# Altium PCB TZ-SB-0001-PCB-[A] (HydroScope Mainboard).PcbDoc (part 2 of 4)
Units mil, origin at the board's own origin, x right, y up, seen from the top; angles counter-clockwise.
Board outline 4500 x 970 mil, 4 copper layers (Top Layer, GND-PWR, GND, Bottom Layer), stack 64.112 mil thick; 165 components, 114 nets, 573 pads, 320 vias.
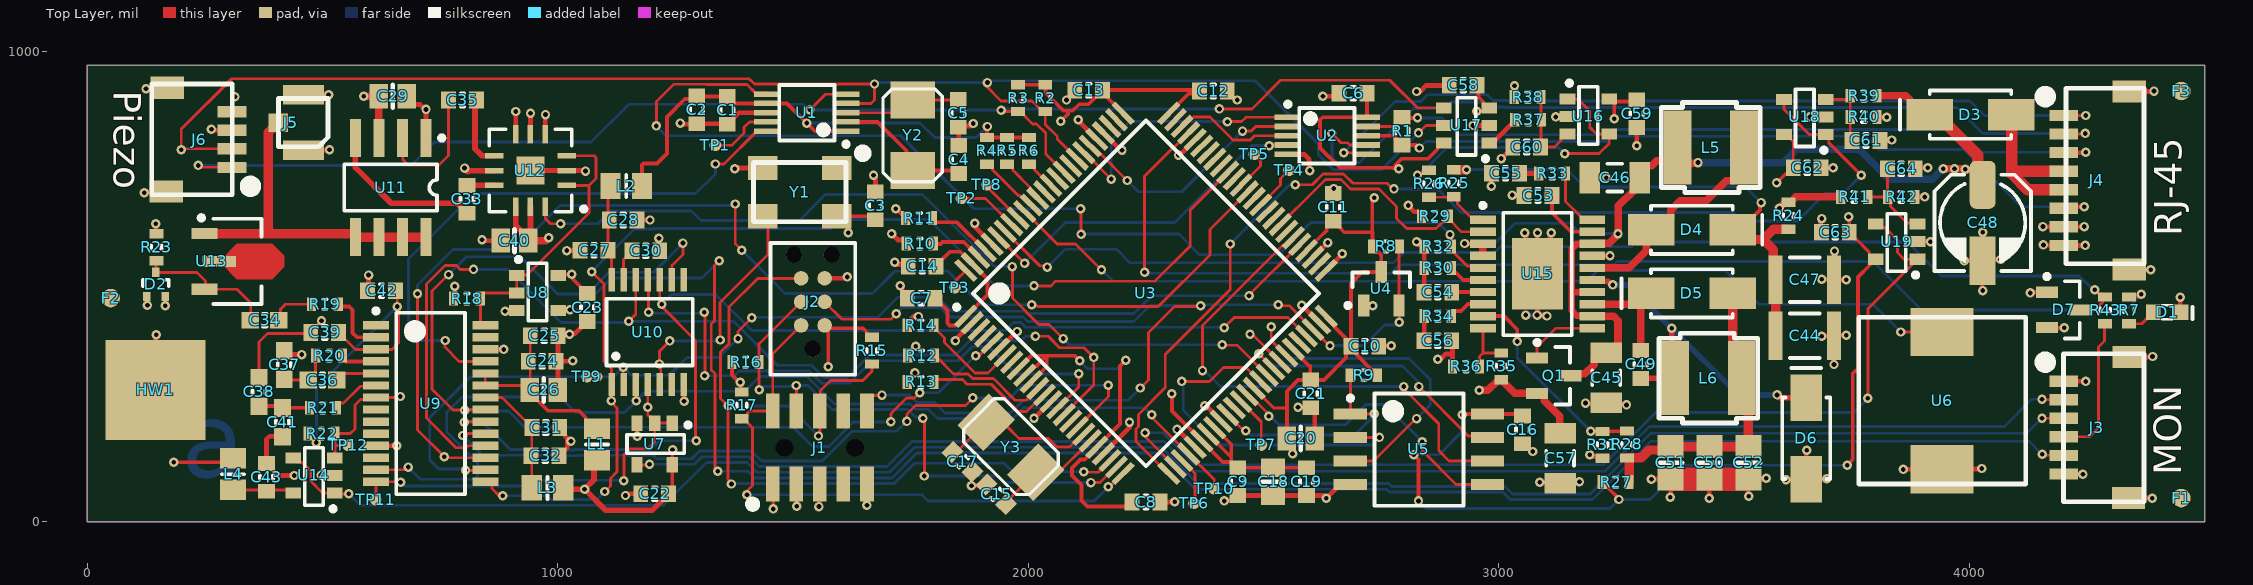
[diagram p0: Top Layer view]

## Part data (continued)
Q1: "TRANS NPN 60V 1A SOT23-3", Case/Package=SOT-23, Collector Base Voltage (VCBO)=80V, Collector Emitter Breakdown Voltage=60V, Collector Emitter Saturation Voltage=160mV, Continuous Collector Current=1A, Emitter Base Voltage (VEBO)=5V, Frequency=150MHz, Manufacturer="Diodes Zetex", Max Operating Temperature=150°C, Max Power Dissipation=500mW, Min Operating Temperature=-55°C, Package Quantity=3000, Supplier Part Number 1=FMMT491CT-ND, Collector Emitter Voltage (VCEO)=60V, ComponentLink1Description=https://datasheet.ciiva.com/974/fmmt491-974176.pdf, ComponentLink1URL=https://datasheet.ciiva.com/974/fmmt491-974176.pdf, ComponentLink2Description=https://datasheet.ciiva.com/5782/313018-5782560.pdf, ComponentLink2URL=https://datasheet.ciiva.com/5782/313018-5782560.pdf, ComponentLink3Description=https://datasheet.ciiva.com/974/fmmt491-974177.pdf, ComponentLink3URL=https://datasheet.ciiva.com/974/fmmt491-974177.pdf, ComponentLink4Description=https://datasheet.ciiva.com/974/fmmt491-974178.pdf, ComponentLink4URL=https://datasheet.ciiva.com/974/fmmt491-974178.pdf, ComponentLink5Description=https://datasheet.ciiva.com/11198/fmmt491-11198278.pdf, ComponentLink5URL=https://datasheet.ciiva.com/11198/fmmt491-11198278.pdf, ComponentLink6Description=https://datasheet.ciiva.com/16211/fmmt491-16211079.pdf, ComponentLink6URL=https://datasheet.ciiva.com/16211/fmmt491-16211079.pdf, ComponentLink7Description=https://datasheet.ciiva.com/15139/getdatasheetpartid-76595-15139033.pdf, ComponentLink7URL=https://datasheet.ciiva.com/15139/getdatasheetpartid-76595-15139033.pdf, ComponentLink8Description=https://datasheet.ciiva.com/4723/fmmt491-4723531.pdf, ComponentLink8URL=https://datasheet.ciiva.com/4723/fmmt491-4723531.pdf, ComponentLink9Description=https://datasheet.ciiva.com/8029/313018-8029549.pdf, ComponentLink9URL=https://datasheet.ciiva.com/8029/313018-8029549.pdf, ComponentLink10Description=https://datasheet.ciiva.com/16614/fmmt491-16614670.pdf, ComponentLink10URL=https://datasheet.ciiva.com/16614/fmmt491-16614670.pdf, ComponentLink11Description=https://datasheet.ciiva.com/5782/313018-5782559.pdf, ComponentLink11URL=https://datasheet.ciiva.com/5782/313018-5782559.pdf, Current Rating=1A, Element Configuration=Single, Gain Bandwidth Product=150MHz, Height=1.02mm, hFE Min=100, Lead Free="Lead Free", Length=3.04mm, Manufacturer Part Number=FMMT491TA, Max Breakdown Voltage=60V, Max Collector Current=1A, Max Frequency=150MHz, Mount="Surface Mount", Number of Elements=1, Number of Pins=3, Packaging="Tape and Reel", Polarity=NPN, Power Dissipation=500mW, Pricing 1="1=0.49, 10=0.399, 100=0.2719, 500=0.20394, 1000=0.15296 (USD)", Radiation Hardening=No, REACH SVHC="No SVHC", Stock 1=30887, Supplier 1=Digi-Key, Termination=SMD/SMT, Transition Frequency=150MHz, Voltage Rating (DC)=60V, Weight=0.000282oz, Width=1.4mm
R1 R20 R21: library part ERJ-3EKF1000V, "RES 100 OHM 1/10W 1% 0603 SMD", Limiting Element Voltage=75, Manufacturer="Panasonic Electronic Components", Maximum Overload Voltage=150, Maximum Working Voltage=3.2V, Package="0603 (1608 Metric)", Package Power="0603  (0.1W)", Power (Watts)="0.1W- 1/10W", Ratings=AEC-Q200, Sort Value Package=603_100, Supplier Package=0603, Supplier Part Number 1=P100HCT-ND, Temperature Coefficient=±100ppm/°C, Tolerance=±1%, Category=Resistors, ComponentLink1Description="Internal Datasheet", ComponentLink1URL="datasheets\Panasonic Electronic Components\AOA0000CE2.pdf", ComponentLink2Description="External Datasheet", ComponentLink2URL=http://industrial.panasonic.com/www-data/pdf/AOA0000/AOA0000CE2.pdf, Composition="Thick Film", Features=-, Height=0.55MM, Manufacturer Part Number=ERJ-3EKF1000V, Number of Terminations=2, Packaging="Cut Tape (CT)", Resistance (Ohms)=100, Size / Dimension="0.063\" L x 0.031\" W (1.60mm x 0.80mm)", Sort Value=100, Substitution Notes="100 , ±1% , 0603 , AEC-Q200", Supplier 1=Digi-Key
  R1: Stocked=0
R2 R3 R7 R23 R43: library part ERJ-3EKF1001V, "RES 1K OHM 1/10W 1% 0603 SMD", Limiting Element Voltage=75, Manufacturer="Panasonic Electronic Components", Maximum Overload Voltage=150, Maximum Working Voltage=10.0V, Package="0603 (1608 Metric)", Package Power="0603  (0.1W)", Power (Watts)="0.1W- 1/10W", Ratings=AEC-Q200, Sort Value=1000, Sort Value Package=603_1000, Supplier Package=0603, Supplier Part Number 1=P1.00KHCT-ND, Temperature Coefficient=±100ppm/°C, Tolerance=±1%, Category=Resistors, ComponentLink1Description="Internal Datasheet", ComponentLink1URL="datasheets\Panasonic Electronic Components\AOA0000CE2.pdf", ComponentLink2Description="External Datasheet", ComponentLink2URL=http://industrial.panasonic.com/www-data/pdf/AOA0000/AOA0000CE2.pdf, Composition="Thick Film", Features=-, Height=0.55MM, Manufacturer Part Number=ERJ-3EKF1001V, Number of Terminations=2, Packaging="Cut Tape (CT)", Resistance (Ohms)=1k, Size / Dimension="0.063\" L x 0.031\" W (1.60mm x 0.80mm)", Substitution Notes="1k , ±1% , 0603 , AEC-Q200", Supplier 1=Digi-Key
R4 R5 R6 R8 R9 R10 R11 R12 R13 R15 R16 R17 R18 R26 R29 R31 R32 R36 R38 R40 R42: library part ERJ-3EKF1002V, "RES 10K OHM 1/10W 1% 0603 SMD", Limiting Element Voltage=75, Manufacturer="Panasonic Electronic Components", Maximum Overload Voltage=150, Maximum Working Voltage=31.6V, Package="0603 (1608 Metric)", Package Power="0603  (0.1W)", Power (Watts)="0.1W- 1/10W", Ratings=AEC-Q200, Sort Value=10000, Sort Value Package=603_10000, Supplier Package=0603, Supplier Part Number 1=P10.0KHCT-ND, Temperature Coefficient=±100ppm/°C, Tolerance=±1%, Category=Resistors, ComponentLink1Description="Internal Datasheet", ComponentLink1URL="datasheets\Panasonic Electronic Components\AOA0000CE2.pdf", ComponentLink2Description="External Datasheet", ComponentLink2URL=http://industrial.panasonic.com/www-data/pdf/AOA0000/AOA0000CE2.pdf, Composition="Thick Film", Features=-, Height=0.55MM, Manufacturer Part Number=ERJ-3EKF1002V, Number of Terminations=2, Packaging="Cut Tape (CT)", Resistance (Ohms)=10k, Size / Dimension="0.063\" L x 0.031\" W (1.60mm x 0.80mm)", Substitution Notes="10k , ±1% , 0603 , AEC-Q200", Supplier 1=Digi-Key
R14: library part ERJ-3EKF1242V, "RES 12.4K OHM 1/10W 1% 0603 SMD", Limiting Element Voltage=75, Manufacturer="Panasonic Electronic Components", Maximum Overload Voltage=150, Maximum Working Voltage=35.2V, Package="0603 (1608 Metric)", Package Power="0603  (0.1W)", Power (Watts)="0.1W- 1/10W", Ratings=AEC-Q200, Sort Value=12400, Sort Value Package=603_12400, Supplier Package=0603, Supplier Part Number 1=P12.4KHCT-ND, Temperature Coefficient=±100ppm/°C, Tolerance=±1%, Category=Resistors, ComponentLink1Description="Internal Datasheet", ComponentLink1URL="datasheets\Panasonic Electronic Components\AOA0000CE2.pdf", ComponentLink2Description="External Datasheet", ComponentLink2URL=http://industrial.panasonic.com/www-data/pdf/AOA0000/AOA0000CE2.pdf, Composition="Thick Film", Features=-, Height=0.55MM, Manufacturer Part Number=ERJ-3EKF1242V, Number of Terminations=2, Packaging="Cut Tape (CT)", Resistance (Ohms)=12.4k, Size / Dimension="0.063\" L x 0.031\" W (1.60mm x 0.80mm)", Substitution Notes="12.4k , ±1% , 0603 , AEC-Q200", Supplier 1=Digi-Key
R19 R24 R27: library part ERJ-3GEY0R00V, "RES 0.0 OHM 1/10W JUMP 0603 SMD", Limiting Element Voltage=75, Manufacturer="Panasonic Electronic Components", Maximum Overload Voltage=150, Maximum Working Voltage=0.0V, Package="0603 (1608 Metric)", Package Power="0603  (0.1W)", Power (Watts)="0.1W- 1/10W", Ratings=AEC-Q200, Sort Value Package=603_0, Supplier Package=0603, Supplier Part Number 1=P0.0GCT-ND, Temperature Coefficient=-, Tolerance=Jumper, Category=Resistors, ComponentLink1Description="Internal Datasheet", ComponentLink1URL="datasheets\Panasonic Electronic Components\AOA0000CE1.pdf", ComponentLink2Description="External Datasheet", ComponentLink2URL=http://industrial.panasonic.com/www-data/pdf/AOA0000/AOA0000CE1.pdf, Composition="Thick Film", Features=-, Height=0.55MM, Manufacturer Part Number=ERJ-3GEY0R00V, Number of Terminations=2, Resistance (Ohms)=0, Size / Dimension="0.063\" L x 0.031\" W (1.60mm x 0.80mm)", Sort Value=0, Substitution Notes="0 , Jumper , 0603 , AEC-Q200", Supplier 1=Digi-Key
R22: library part ERJ-3EKF5101V, "RES 5.1K OHM 1/10W 1% 0603 SMD", Limiting Element Voltage=75, Manufacturer="Panasonic Electronic Components", Maximum Overload Voltage=150, Maximum Working Voltage=22.6V, Package="0603 (1608 Metric)", Package Power="0603  (0.1W)", Power (Watts)="0.1W- 1/10W", Ratings=AEC-Q200, Sort Value=5100, Sort Value Package=603_5100, Supplier Package=0603, Supplier Part Number 1=P5.10KHCT-ND, Temperature Coefficient=±100ppm/°C, Tolerance=±1%, Category=Resistors, ComponentLink1Description="Internal Datasheet", ComponentLink1URL="datasheets\Panasonic Electronic Components\AOA0000CE2.pdf", ComponentLink2Description="External Datasheet", ComponentLink2URL=http://industrial.panasonic.com/www-data/pdf/AOA0000/AOA0000CE2.pdf, Composition="Thick Film", Features=-, Height=0.55MM, Manufacturer Part Number=ERJ-3EKF5101V, Number of Terminations=2, Packaging="Cut Tape (CT)", Resistance (Ohms)=5.1k, Size / Dimension="0.063\" L x 0.031\" W (1.60mm x 0.80mm)", Substitution Notes="5.1k , ±1% , 0603 , AEC-Q200", Supplier 1=Digi-Key
R25: library part ERJ-3EKF5603V, "RES 560K OHM 1/10W 1% 0603 SMD", Limiting Element Voltage=75, Manufacturer="Panasonic Electronic Components", Maximum Overload Voltage=150, Maximum Working Voltage=75.0V, Package="0603 (1608 Metric)", Package Power="0603  (0.1W)", Power (Watts)="0.1W- 1/10W", Ratings=AEC-Q200, Sort Value=560000, Sort Value Package=603_560000, Supplier Package=0603, Supplier Part Number 1=P560KHCT-ND, Temperature Coefficient=±100ppm/°C, Tolerance=±1%, Category=Resistors, ComponentLink1Description="Internal Datasheet", ComponentLink1URL="datasheets\Panasonic Electronic Components\AOA0000CE2.pdf", ComponentLink2Description="External Datasheet", ComponentLink2URL=http://industrial.panasonic.com/www-data/pdf/AOA0000/AOA0000CE2.pdf, Composition="Thick Film", Features=-, Height=0.55MM, Manufacturer Part Number=ERJ-3EKF5603V, Number of Terminations=2, Packaging="Cut Tape (CT)", Resistance (Ohms)=560k, Size / Dimension="0.063\" L x 0.031\" W (1.60mm x 0.80mm)", Substitution Notes="560k , ±1% , 0603 , AEC-Q200", Supplier 1=Digi-Key
R28 R37: library part ERJ-3EKF3162V, "RES 31.6K OHM 1/10W 1% 0603 SMD", Limiting Element Voltage=75, Manufacturer="Panasonic Electronic Components", Maximum Overload Voltage=150, Maximum Working Voltage=56.2V, Package="0603 (1608 Metric)", Package Power="0603  (0.1W)", Power (Watts)="0.1W- 1/10W", Ratings=AEC-Q200, Sort Value=31600, Sort Value Package=603_31600, Supplier Package=0603, Supplier Part Number 1=P31.6KHCT-ND, Temperature Coefficient=±100ppm/°C, Tolerance=±1%, Category=Resistors, ComponentLink1Description="Internal Datasheet", ComponentLink1URL="datasheets\Panasonic Electronic Components\AOA0000CE2.pdf", ComponentLink2Description="External Datasheet", ComponentLink2URL=http://industrial.panasonic.com/www-data/pdf/AOA0000/AOA0000CE2.pdf, Composition="Thick Film", Features=-, Height=0.55MM, Manufacturer Part Number=ERJ-3EKF3162V, Number of Terminations=2, Packaging="Cut Tape (CT)", Resistance (Ohms)=31.6k, Size / Dimension="0.063\" L x 0.031\" W (1.60mm x 0.80mm)", Substitution Notes="31.6k , ±1% , 0603 , AEC-Q200", Supplier 1=Digi-Key
R30 R33 R34: library part ERJ-3EKF4302V, "RES 43K OHM 1/10W 1% 0603 SMD", Limiting Element Voltage=75, Manufacturer="Panasonic Electronic Components", Maximum Overload Voltage=150, Maximum Working Voltage=65.6V, Package="0603 (1608 Metric)", Package Power="0603  (0.1W)", Power (Watts)="0.1W- 1/10W", Ratings=AEC-Q200, Sort Value=43000, Sort Value Package=603_43000, Supplier Package=0603, Supplier Part Number 1=P43.0KHCT-ND, Temperature Coefficient=±100ppm/°C, Tolerance=±1%, Category=Resistors, ComponentLink1Description="Internal Datasheet", ComponentLink1URL="datasheets\Panasonic Electronic Components\AOA0000CE2.pdf", ComponentLink2Description="External Datasheet", ComponentLink2URL=http://industrial.panasonic.com/www-data/pdf/AOA0000/AOA0000CE2.pdf, Composition="Thick Film", Features=-, Height=0.55MM, Manufacturer Part Number=ERJ-3EKF4302V, Number of Terminations=2, Packaging="Cut Tape (CT)", Resistance (Ohms)=43k, Size / Dimension="0.063\" L x 0.031\" W (1.60mm x 0.80mm)", Substitution Notes="43k , ±1% , 0603 , AEC-Q200", Supplier 1=Digi-Key
R35: library part ERJ-3EKF1003V, "RES 100K OHM 1/10W 1% 0603 SMD", Limiting Element Voltage=75, Manufacturer="Panasonic Electronic Components", Maximum Overload Voltage=150, Maximum Working Voltage=75.0V, Package="0603 (1608 Metric)", Package Power="0603  (0.1W)", Power (Watts)="0.1W- 1/10W", Ratings=AEC-Q200, Sort Value=100000, Sort Value Package=603_100000, Supplier Package=0603, Supplier Part Number 1=P100KHCT-ND, Temperature Coefficient=±100ppm/°C, Tolerance=±1%, Category=Resistors, ComponentLink1Description="Internal Datasheet", ComponentLink1URL="datasheets\Panasonic Electronic Components\AOA0000CE2.pdf", ComponentLink2Description="External Datasheet", ComponentLink2URL=http://industrial.panasonic.com/www-data/pdf/AOA0000/AOA0000CE2.pdf, Composition="Thick Film", Features=-, Height=0.55MM, Manufacturer Part Number=ERJ-3EKF1003V, Number of Terminations=2, Packaging="Cut Tape (CT)", Resistance (Ohms)=100k, Size / Dimension="0.063\" L x 0.031\" W (1.60mm x 0.80mm)", Substitution Notes="100k , ±1% , 0603 , AEC-Q200", Supplier 1=Digi-Key
R39 R41: library part ERJ-3EKF3743V, "RES 374K OHM 1/10W 1% 0603 SMD", Limiting Element Voltage=75, Manufacturer="Panasonic Electronic Components", Maximum Overload Voltage=150, Maximum Working Voltage=75.0V, Package="0603 (1608 Metric)", Package Power="0603  (0.1W)", Power (Watts)="0.1W- 1/10W", Ratings=AEC-Q200, Sort Value=374000, Sort Value Package=603_374000, Supplier Package=0603, Supplier Part Number 1=P374KHCT-ND, Temperature Coefficient=±100ppm/°C, Tolerance=±1%, Category=Resistors, ComponentLink1Description="Internal Datasheet", ComponentLink1URL="datasheets\Panasonic Electronic Components\AOA0000CE2.pdf", ComponentLink2Description="External Datasheet", ComponentLink2URL=http://industrial.panasonic.com/www-data/pdf/AOA0000/AOA0000CE2.pdf, Composition="Thick Film", Features=-, Height=0.55MM, Manufacturer Part Number=ERJ-3EKF3743V, Number of Terminations=2, Packaging="Cut Tape (CT)", Resistance (Ohms)=374k, Size / Dimension="0.063\" L x 0.031\" W (1.60mm x 0.80mm)", Substitution Notes="374k , ±1% , 0603 , AEC-Q200", Supplier 1=Digi-Key
U1: "Clock Generators & Support Products Any-Rate, Dual PLL 1 60MHz Clock 8outputs", Case/Package=MSOP, Manufacturer="Silicon Labs", Max Frequency=160MHz, Max Operating Temperature=85°C, Min Operating Temperature=-40°C, Operating Supply Current=22mA, Operating Supply Voltage=3.3V, Package Quantity=2500, Supplier Part Number 1=336-3908-1-ND, ComponentLink1Description=http://www.mouser.com/ds/2/368/Si5351-B-346869.pdf, ComponentLink1URL=http://www.mouser.com/ds/2/368/Si5351-B-346869.pdf, ComponentLink2Description=https://www.silabs.com/Support%20Documents/TechnicalDocs/Si5350-51-short.pdf, ComponentLink2URL=https://www.silabs.com/Support%20Documents/TechnicalDocs/Si5350-51-short.pdf, ComponentLink3Description=https://www.silabs.com/Support%20Documents/TechnicalDocs/Si5351-B.pdf, ComponentLink3URL=https://www.silabs.com/Support%20Documents/TechnicalDocs/Si5351-B.pdf, Input=Crystal, Manufacturer Part Number=SI5351A-B-GTR, Max Duty Cycle=55%, Mount="Surface Mount", Number of Circuits=1, Number of Outputs=3, Number of Pins=10, Packaging="Tape and Reel", PLL=Yes, Pricing 1="1=0.92, 25=0.8816, 100=0.8475 (USD)", Stock 1=11416, Supplier 1=Digi-Key
U2: "IC TXRX RS422/485 20MBPS 10MSOP", Manufacturer=Intersil, Operating Temperature="-40°C ~ 85°C", Package / Case="10-TFSOP, 10-MSOP (0.118\", 3.00mm Width)", Supplier Device Package=10-MSOP, Supplier Part Number 1=ISL3176EIUZ-TCT-ND, Voltage - Supply="3 V ~ 3.6 V", Category="Integrated Circuits (ICs)", ComponentLink1Description=http://www.intersil.com/content/dam/intersil/documents/isl3/isl3170e-71e-72e-73e-74e-75e-76e-77e-78e.pdf, ComponentLink1URL=http://www.intersil.com/content/dam/intersil/documents/isl3/isl3170e-71e-72e-73e-74e-75e-76e-77e-78e.pdf, Data Rate=20Mbps, Duplex=Full, Manufacturer Part Number=ISL3176EIUZ-T, Mounting Type="Surface Mount", Number of Drivers/Receivers=1/1, Packaging="Cut Tape (CT)", Part Status=Active, Pricing 1="1=1.79, 10=1.61, 100=1.2944, 500=1.06348, 1000=0.88117 (USD)", Protocol="RS422, RS485", RoHS="RoHS Compliant", Stock 1=9164, Supplier 1=Digi-Key, Type=Transceiver
U3: "32-BIT ARM CORTEX-M4", Manufacturer="NXP USA Inc.", Operating Temperature="-40°C ~ 105°C (TA)", Package / Case=100-LQFP, Supplier Device Package="100-LQFP (14x14)", Supplier Part Number 1=568-13456-ND, Voltage - Supply (Vcc/Vdd)="1.71 V ~ 3.6 V", Category="Integrated Circuits (ICs)", ComponentLink1Description=http://www.nxp.com/docs/en/data-sheet/LPC546XX.pdf, ComponentLink1URL=http://www.nxp.com/docs/en/data-sheet/LPC546XX.pdf, Connectivity="CAN, Ethernet, I²C, SPI, UART/USART, USB", Core Processor="ARM® Cortex®-M4", Core Size=32-Bit, Data Converters="A/D 12x12b", EEPROM Size="16K x 8", Manufacturer Part Number=LPC54606J512BD100E, Oscillator Type=Internal, Packaging=Tray, Part Status=Active, Peripherals="Brown-out Detect/Reset, DMA, I²S, POR, PWM, WDT", Program Memory Size="512KB (512K x 8)", Program Memory Type=FLASH, RAM Size="200K x 8", RoHS="Request Inventory Verification", Speed=180MHz, Stock 1=0, Supplier 1=Digi-Key
U4: "3-Pin Microprocessor Supervisor Circuit w/ Open-Drain Reset Output, 3 SOT-23 - T/R", Case/Package=TO-236-3, Manufacturer=Microchip, Max Operating Temperature=125°C, Min Operating Temperature=-40°C, Number of Voltages Monitored=1, Supplier Part Number 1=576-3808-1-ND, Threshold Voltage=3V, Lead Free="Lead Free", Manufacturer Part Number=MIC803-30D2VM3-TR, Mount="Surface Mount", Packaging="Cit Tape (CT)", Pricing 1="1=0.3, 25=0.252, 100=0.231 (USD)", Reset="Active Low", Reset Timeout=20ms, Stock 1=3642, Supplier 1=Digi-Key, Type="Simple Reset/Power-On Reset"
U5: "NOR Flash Serial-SPI 3V 64MBit 64M x 1bit 6ns 8-Pin SOIC", Case/Package=SOIC, Frequency=104MHz, Manufacturer=Winbond, Max Operating Temperature=85°C, Max Supply Voltage=3.6V, Min Operating Temperature=-40°C, Min Supply Voltage=2.7V, Operating Supply Voltage=3V, Supplier Part Number 1=W25Q64JVSSIQ-ND, Access Time=6ns, Address Bus Width=24b, ComponentLink1Description=http://www.winbond.com/resource-files/w25q64jv%20spi%20revg%2012142016.pdf, ComponentLink1URL=http://www.winbond.com/resource-files/w25q64jv%20spi%20revg%2012142016.pdf, ComponentLink2Description=https://www.winbond.com/resource-files/w25q64jv%20spi%20%20%20revc%2006032016%20kms.pdf, ComponentLink2URL=https://www.winbond.com/resource-files/w25q64jv%20spi%20%20%20revc%2006032016%20kms.pdf, Density=64MB, Interface=SPI,Serial, Manufacturer Part Number=W25Q64JVSSIQ, Memory Type=NOR,FLASH, Mount="Surface Mount", Packaging=Tray, Page Size=256B, Pricing 1="1=1.36 (USD)", Stock 1=41923, Supplier 1=Digi-Key
U6: "Audio Indicators & Alerts Piezo Buzzer 9x9mm 4KHz 1.9mm Thickness", Frequency=4kHz, Manufacturer=Murata, Max Operating Temperature=85°C, Max Supply Voltage (DC)=12.5V, Min Operating Temperature=-40°C, Min Supply Voltage (DC)=-12.5V, Package Quantity=2000, Supplier Part Number 1=490-9647-1-ND, Voltage Rating=1.5V, ComponentLink1Description=https://datasheet.ciiva.com/24244/pkmcs0909e4000-r1-304946-24244386.pdf, ComponentLink1URL=https://datasheet.ciiva.com/24244/pkmcs0909e4000-r1-304946-24244386.pdf, Depth=9mm, Height=1.9mm, Lead Free="Lead Free", Length=9mm, Manufacturer Part Number=PKMCS0909E4000-R1, Mount="Surface Mount", Packaging="Tape and Reel", Pricing 1="1=1.96, 10=1.708, 25=1.3284, 50=1.2018, 100=1.0753, 250=1.04364, 500=1.012, 1000=0.91713 (USD)", Radiation Hardening=No, REACH SVHC="No SVHC", Self Resonant Frequency=4kHz, Stock 1=28739, Supplier 1=Digi-Key, Termination=Solder, Voltage Rating (DC)=12.5V, Width=9mm
U7 U8: "IC SGL 2IN POS-AND GATE SOT23-5", Current - Output High, Low="8mA, 8mA", Manufacturer="Texas Instruments", Operating Temperature="-40°C ~ 85°C", Package / Case="SOT-23-5, SC-74A, SOT-25", Supplier Part Number 1=296-1091-1-ND, Voltage - Supply="2 V ~ 5.5 V", Category="Integrated Circuits (ICs)", ComponentLink1Description=http://focus.ti.com/lit/ds/symlink/sn74ahc1g08.pdf, ComponentLink1URL=http://focus.ti.com/lit/ds/symlink/sn74ahc1g08.pdf, Logic Type="AND Gate", Manufacturer Part Number=SN74AHC1G08DBVR, Mounting Type="Surface Mount", Number of Circuits=1, Number of Inputs=2, Packaging="Cut Tape (CT)", Pricing 1="1=0.53, 25=0.31, 100=0.25, 250=0.18, 500=0.145, 1000=0.1125 (USD)", RoHS="RoHS Compliant", Stock 1=63967, Supplier 1=Digi-Key
U9: "IC AFE ULTRA SENSING 28TSSOP", Manufacturer="Texas Instruments", Operating Temperature="-40°C ~ 125°C", Package / Case="28-TSSOP (0.173\", 4.40mm Width)", Supplier Device Package=28-TSSOP, Supplier Part Number 1=296-39657-ND, Category="Integrated Circuits (ICs)", ComponentLink1Description=http://www.ti.com/lit/ds/symlink/tdc1000.pdf, ComponentLink1URL=http://www.ti.com/lit/ds/symlink/tdc1000.pdf, Input Type=Ultrasound, Interface=SPI, Manufacturer Part Number=TDC1000PW, Mounting Type="Surface Mount", Output Type=Digital, Packaging=Tray, Part Status=Active, Pricing 1="1=6.61, 10=5.152, 25=4.1796, 100=3.5964, 250=3.3048, 500=3.0132, 1000=2.8188 (USD)", RoHS="RoHS Compliant", Stock 1=125, Supplier 1=Digi-Key, Type="Front End"
U10: "IC DIG CONV 14TSSOP", Manufacturer="Texas Instruments", Operating Temperature="-40°C ~ 85°C", Package / Case="14-TSSOP (0.173\", 4.40mm Width)", Supplier Device Package=14-TSSOP, Supplier Part Number 1=296-44361-6-ND, Category="Integrated Circuits (ICs)", ComponentLink1Description=http://www.ti.com/lit/ds/symlink/tdc7200.pdf, ComponentLink1URL=http://www.ti.com/lit/ds/symlink/tdc7200.pdf, Input Type=Ultrasound, Interface=SPI, Manufacturer Part Number=TDC7200PWR, Mounting Type="Surface Mount", Output Type=Digital, Packaging=Digi-Reel®, Part Status=Active, Pricing 1="1=2.77, 10=2.138, 25=1.782, 100=1.5048, 250=1.4256, 500=1.2672, 1000=1.188 (USD)", RoHS="RoHS Compliant", Stock 1=2396, Supplier 1=Digi-Key, Type="Time to Flight to Digital Converter"
U11: "Trans MOSFET N/P-CH 200V 8-Pin SOIC N T/R", Case/Package=SOIC, Continuous Drain Current (ID)=-2A, Drain to Source Breakdown Voltage=200V, Drain to Source Resistance=8R, Manufacturer="Microchip Supertex", Max Operating Temperature=150°C, Min Operating Temperature=-55°C, On-State Resistance=15R, Package Quantity=2000, Supplier Part Number 1=TC6320TG-GCT-ND, ComponentLink1Description=https://datasheet.ciiva.com/30195/tc6320-30195222.pdf, ComponentLink1URL=https://datasheet.ciiva.com/30195/tc6320-30195222.pdf, ComponentLink2Description=https://datasheet.ciiva.com/15746/md0100-15746487.pdf, ComponentLink2URL=https://datasheet.ciiva.com/15746/md0100-15746487.pdf, ComponentLink3Description=https://datasheet.ciiva.com/30248/656md0100-30248377.pdf, ComponentLink3URL=https://datasheet.ciiva.com/30248/656md0100-30248377.pdf, Fall Time=15ns, Length=4.6mm, Manufacturer Part Number=TC6320TG-G, Mount="Surface Mount", Number of Elements=2, Number of Pins=8, Packaging="Tape and Reel", Pricing 1="1=1.42, 25=1.1768, 100=1.114 (USD)", Pricing 2="1=1.24, 25=1.0284, 100=0.9328 (USD)", Radiation Hardening=No, Rise Time=15ns, Stock 1=1592, Stock 2=609, Supplier 1=Digi-Key, Supplier 2=Digi-Key, Supplier Part Number 2=MD0100N8-GCT-ND, Turn-Off Delay Time=20ns, Turn-On Delay Time=10ns
U12: "Gate Drivers HI SPD DUAL MOSFET DRIVER", Case/Package=QFN, Frequency=100kHz, Manufacturer="Microchip Supertex", Max Operating Temperature=85°C, Max Output Current=2A, Max Supply Voltage=13V, Min Operating Temperature=-20°C, Min Supply Voltage=4.5V, Nominal Supply Current=550uA, Operating Supply Voltage=12V, Package Quantity=3000, Supplier Part Number 1=MD1213K6-GCT-ND, ComponentLink1Description=https://datasheet.ciiva.com/4898/md1213-30882-4898732.pdf, ComponentLink1URL=https://datasheet.ciiva.com/4898/md1213-30882-4898732.pdf, ComponentLink2Description=https://datasheet.ciiva.com/30175/md1213-30175933.pdf, ComponentLink2URL=https://datasheet.ciiva.com/30175/md1213-30175933.pdf, Fall Time=6ns, Manufacturer Part Number=MD1213K6-G, Mount="Surface Mount", Number of Drivers=2, Number of Outputs=2, Number of Pins=12, Output Current=2A, Packaging="Tape and Reel", Pricing 1="1=1.61, 25=1.3464, 100=1.219 (USD)", Propagation Delay=7ns, Rise Time=6ns, Stock 1=2628, Supplier 1=Digi-Key
U13: "High Voltage Protection T/R Switch 4-Pin(3+Tab) SOT-89", Case/Package=SOT-89, Manufacturer="Microchip Supertex", Max Operating Temperature=125°C, Min Operating Temperature=-40°C, On-State Resistance=15R, Package Quantity=2000, Supplier Part Number 1=MD0100N8-GCT-ND, ComponentLink1Description=https://datasheet.ciiva.com/15746/md0100-15746487.pdf, ComponentLink1URL=https://datasheet.ciiva.com/15746/md0100-15746487.pdf, ComponentLink2Description=https://datasheet.ciiva.com/30248/656md0100-30248377.pdf, ComponentLink2URL=https://datasheet.ciiva.com/30248/656md0100-30248377.pdf, Length=4.6mm, Manufacturer Part Number=MD0100N8-G, Mount="Surface Mount", Number of Pins=4, Packaging="Tape and Reel", Pricing 1="1=1.24, 25=1.0284, 100=0.9328 (USD)", Stock 1=609, Supplier 1=Digi-Key
U14: "IC OPAMP GP 44MHZ RRO SOT23-5", Current - Input Bias=0.5pA, Current - Output / Channel=40mA, Current - Supply=5.2mA, Manufacturer="Texas Instruments", Operating Temperature="-40°C ~ 85°C", Package / Case="SC-74A, SOT-753", Supplier Device Package=SOT-23-5, Supplier Part Number 1=OPA353NACT-ND, Voltage - Input Offset=3mV, Voltage - Supply, Single/Dual (±)="2.5 V ~ 5.5 V, ±1.25 V ~ 2.75 V", -3db Bandwidth=-, Amplifier Type="General Purpose", Category="Integrated Circuits (ICs)", ComponentLink1Description=http://www.ti.com/lit/ds/symlink/opa353.pdf, ComponentLink1URL=http://www.ti.com/lit/ds/symlink/opa353.pdf, Gain Bandwidth Product=44MHz, Manufacturer Part Number=OPA353NA/250, Mounting Type="Surface Mount", Number of Circuits=1, Output Type=Rail-to-Rail, Packaging="Cut Tape (CT)", Pricing 1="1=2.98, 10=2.671, 100=2.1909 (USD)", RoHS="RoHS Compliant", Slew Rate="22 V/µs", Stock 1=21970, Supplier 1=Digi-Key
U15: "IC REG BUCK/BST/LINEAR 20TSSOP", Case/Package=TSSOP, Frequency=3MHz, Manufacturer="Linear Technology", Max Input Voltage=36V, Max Operating Temperature=125°C, Max Output Current=1.5A, Min Input Voltage=2.5V, Min Operating Temperature=-40°C, Min Output Voltage=800mV, Package Quantity=74, Switching Frequency=2.1MHz, ComponentLink1Description=https://datasheet.ciiva.com/2076/26936-2076065.pdf, ComponentLink1URL=https://datasheet.ciiva.com/2076/26936-2076065.pdf, ComponentLink2Description=https://datasheet.ciiva.com/6192/1692490-6192694.pdf, ComponentLink2URL=https://datasheet.ciiva.com/6192/1692490-6192694.pdf, ComponentLink3Description=https://datasheet.ciiva.com/7363/1692490-7363821.pdf, ComponentLink3URL=https://datasheet.ciiva.com/7363/1692490-7363821.pdf, ComponentLink4Description=https://datasheet.ciiva.com/7905/1692490-7905870.pdf, ComponentLink4URL=https://datasheet.ciiva.com/7905/1692490-7905870.pdf, Lead Free="Lead Free", Manufacturer Part Number=LT3570EFE#PBF, Max Supply Voltage=36V, Min Supply Voltage=2.5V, Number of Outputs=2, Number of Pins=20, Output Current=1.5A, Output Voltage=800mV, Packaging=Rail/Tube, Pricing 1="1=4.36, 99=3.7 (USD)", Radiation Hardening=No, REACH SVHC="No SVHC", Stock 1=2204, Supplier 1=Arrow, Supplier Part Number 1=LT3570EFE#PBF, Termination=SMD/SMT, Voltage - Output 1=800mV, Voltage - Output 2=800mV
U16 U18 U19: "IC OPAMP GP 1MHZ RRO SOT23-5", Case/Package=SOT-23, Input Bias Current=10pA, Input Offset Voltage (Vos)=5mV, Manufacturer="Texas Instruments", Max Operating Temperature=125°C, Max Supply Voltage=5.5V, Min Operating Temperature=-40°C, Min Supply Voltage=2.5V, Nominal Supply Current=65uA, Operating Supply Current=45uA, Output Current per Channel=10mA, Package Quantity=3000, Power Supply Rejection Ratio (PSRR)=84.44dB, Supplier Part Number 1=296-26277-1-ND, Voltage Gain=108dB, Bandwidth=1MHz, Common Mode Rejection Ratio=70dB, ComponentLink1Description=https://datasheet.ciiva.com/2974/opa4348-2974011.pdf, ComponentLink1URL=https://datasheet.ciiva.com/2974/opa4348-2974011.pdf, ComponentLink2Description=https://datasheet.ciiva.com/2974/opa4348-2974012.pdf, ComponentLink2URL=https://datasheet.ciiva.com/2974/opa4348-2974012.pdf, ComponentLink3Description=https://datasheet.ciiva.com/1811/opa2348-1811421.pdf, ComponentLink3URL=https://datasheet.ciiva.com/1811/opa2348-1811421.pdf, ComponentLink4Description=https://datasheet.ciiva.com/26226/opa4348-26226685.pdf, ComponentLink4URL=https://datasheet.ciiva.com/26226/opa4348-26226685.pdf, ComponentLink5Description=https://datasheet.ciiva.com/1811/opa2348-1811422.pdf, ComponentLink5URL=https://datasheet.ciiva.com/1811/opa2348-1811422.pdf, ComponentLink6Description=https://datasheet.ciiva.com/1811/opa2348-1811423.pdf, ComponentLink6URL=https://datasheet.ciiva.com/1811/opa2348-1811423.pdf, Contact Plating=Gold, Gain Bandwidth Product=1MHz, Height=1.15mm, Lead Free="Lead Free", Length=2.9mm, Manufacturer Part Number=OPA348AIDBVR, Max I/O Voltage=5mV, Nominal Gain Bandwidth Product=1MHz, Number of Amplifiers=1, Number of Channels=1, Number of Circuits=1, Number of Elements=1, Number of Pins=5, Packaging="Tape and Reel", Pricing 1="1=0.68, 10=0.598, 100=0.4586, 500=0.36256, 1000=0.29005 (USD)", Radiation Hardening=No, REACH SVHC="No SVHC", Slew Rate=0.5V/µs, Stock 1=13530, Supplier 1=Digi-Key, Unity Gain Bandwidth Product=1MHz, Width=1.6mm
U17: "IC DAC 12BIT W/I2C SOT23A-6", Case/Package=SOT-23-6, Input Offset Voltage (Vos)=1.1mV, Manufacturer=Microchip, Max Operating Temperature=125°C, Max Supply Voltage=5.5V, Min Operating Temperature=-40°C, Min Supply Voltage=2.7V, Nominal Supply Current=210uA, Package Quantity=3000, Supplier Part Number 1=MCP4725A0T-E/CHDKR-ND, ComponentLink1Description=https://datasheet.ciiva.com/7660/1470577-7660741.pdf, ComponentLink1URL=https://datasheet.ciiva.com/7660/1470577-7660741.pdf, ComponentLink2Description=https://datasheet.ciiva.com/16355/filehandler-aspxddocname-en532676-16355109.pdf, ComponentLink2URL=https://datasheet.ciiva.com/16355/filehandler-aspxddocname-en532676-16355109.pdf, ComponentLink3Description=https://datasheet.ciiva.com/8169/22039c-8169286.pdf, ComponentLink3URL=https://datasheet.ciiva.com/8169/22039c-8169286.pdf, ComponentLink4Description=https://datasheet.ciiva.com/12285/22039c-78124-12285942.pdf, ComponentLink4URL=https://datasheet.ciiva.com/12285/22039c-78124-12285942.pdf, ComponentLink5Description=https://datasheet.ciiva.com/16625/22039c-16625638.pdf, ComponentLink5URL=https://datasheet.ciiva.com/16625/22039c-16625638.pdf, ComponentLink6Description=https://datasheet.ciiva.com/26947/getdatasheetpartid-780909-26947786.pdf, ComponentLink6URL=https://datasheet.ciiva.com/26947/getdatasheetpartid-780909-26947786.pdf, ComponentLink7Description=https://datasheet.ciiva.com/1359/22039d-1359787.pdf, ComponentLink7URL=https://datasheet.ciiva.com/1359/22039d-1359787.pdf, ComponentLink8Description=https://datasheet.ciiva.com/1359/22039d-1359788.pdf, ComponentLink8URL=https://datasheet.ciiva.com/1359/22039d-1359788.pdf, ComponentLink9Description=https://datasheet.ciiva.com/1359/22039d-1359789.pdf, ComponentLink9URL=https://datasheet.ciiva.com/1359/22039d-1359789.pdf, ComponentLink10Description=https://datasheet.ciiva.com/14180/mcp4725-eng-tds-14180126.pdf, ComponentLink10URL=https://datasheet.ciiva.com/14180/mcp4725-eng-tds-14180126.pdf, Contact Plating=Tin,Matte, Height=1.3mm, Integral Nonlinearity (INL)=14.5LSB, Interface=I2C,Serial,2-Wire, Lead Free="Lead Free", Length=3.1mm, Manufacturer Part Number=MCP4725A0T-E/CH, Mount="Surface Mount", Number of Bits=12, Number of Channels=1, Number of Converters=1, Number of D/A Converters=1, Number of DAC Channels=1, Number of Outputs=1, Number of Pins=6, Output Type=Voltage, Packaging="Tape and Reel", Polarity=Unipolar, Pricing 1="1=1.02, 25=0.848, 100=0.7738 (USD)", Radiation Hardening=No, REACH SVHC="No SVHC", Resolution=12b, Settling Time=6us, Stock 1=42678, Supplier 1=Digi-Key, Supply Type=Single, Termination=SMD/SMT, Width=1.8mm
Y1: "OSC TCXO 16.000MHZ HCMOS SMD", Case/Package=SMD/SMT, Frequency=16MHz, Frequency Stability=2.5ppm, Frequency Tolerance=1.5ppm, Load Capacitance=15pF, Manufacturer="Fox Electronics", Max Operating Temperature=85°C, Max Supply Current=6mA, Max Supply Voltage=3.465V, Min Operating Temperature=-30°C, Min Supply Voltage=3.135V, Operating Supply Voltage=3.3V, Package Quantity=1000, Supplier Part Number 1=631-1071-6-ND, ComponentLink1Description=https://datasheet.ciiva.com/1368/fox924-1368419.pdf, ComponentLink1URL=https://datasheet.ciiva.com/1368/fox924-1368419.pdf, ComponentLink2Description=https://datasheet.ciiva.com/867/fox924-867140.pdf, ComponentLink2URL=https://datasheet.ciiva.com/867/fox924-867140.pdf, ComponentLink3Description=https://datasheet.ciiva.com/867/fox924-867141.pdf, ComponentLink3URL=https://datasheet.ciiva.com/867/fox924-867141.pdf, ComponentLink4Description=https://datasheet.ciiva.com/867/fox924-867142.pdf, ComponentLink4URL=https://datasheet.ciiva.com/867/fox924-867142.pdf, ComponentLink5Description=https://datasheet.ciiva.com/9318/fox924-9318182.pdf, ComponentLink5URL=https://datasheet.ciiva.com/9318/fox924-9318182.pdf, ComponentLink6Description=https://datasheet.ciiva.com/16439/fox924-16439159.pdf, ComponentLink6URL=https://datasheet.ciiva.com/16439/fox924-16439159.pdf, ComponentLink7Description=https://datasheet.ciiva.com/1360/fox924-1360459.pdf, ComponentLink7URL=https://datasheet.ciiva.com/1360/fox924-1360459.pdf, ComponentLink8Description=https://datasheet.ciiva.com/9318/fox924-9318188.pdf, ComponentLink8URL=https://datasheet.ciiva.com/9318/fox924-9318188.pdf, ComponentLink9Description=https://datasheet.ciiva.com/28454/1465427-28454605.pdf, ComponentLink9URL=https://datasheet.ciiva.com/28454/1465427-28454605.pdf, Height=0.059inch, Lead Free="Lead Free", Length=0.197inch, Manufacturer Part Number=FOX924B-16.000, Mount="Surface Mount", Number of Pins=4, Packaging="Tape and Reel", Pricing 1="1=2.34, 10=2.287, 50=2.178, 100=1.9058, 500=1.8513 (USD)", Radiation Hardening=No, REACH SVHC="No SVHC", Stock 1=18310, Supplier 1=Digi-Key, Width=0.126inch
Y2: "25MHz ±30ppm Crystal 18pF 30 Ohm -20°C ~ 70°C  Surface Mount 2-SMD, No Lead (DFN, LCC)", Case/Package=SMD/SMT, ESR (Equivalent Series Resistance)=30R, Frequency=25MHz, Frequency Stability=30ppm, Load Capacitance=18pF, Manufacturer=Abracon, Max Operating Temperature=70°C, Min Operating Temperature=-20°C, Supplier Part Number 1=535-13587-1-ND, ComponentLink1Description=http://www.abracon.com/Resonators/abm3.pdf, ComponentLink1URL=http://www.abracon.com/Resonators/abm3.pdf, Frequency Tolerance=30ppm, Height=0.051inch, Length=0.197inch, Manufacturer Part Number=ABM3-25.000MHZ-B4Y-T, Mount="Surface Mount", Packaging="Tape and Reel", Pricing 1="1=1.09, 10=0.961, 50=0.8988, 100=0.7942, 500=0.7524 (USD)", Stock 1=1849, Supplier 1=Digi-Key, Width=0.126inch
Y3: library part ABM3-12.000MHZ-B2-T, "CRYSTAL 12.000MHZ 18PF SMD", Frequency Stability=±50ppm, Frequency Tolerance=±20ppm, Load Capacitance=18pF, Manufacturer="Abracon Corporation", Operating Mode=Fundamental, Operating Temperature="-20°C ~ 70°C", Package / Case="2-SMD, No Lead (DFN, LCC)", Supplier Part Number 1=535-9100-1-ND, Category="Crystals and Oscillators", ComponentLink1Description=http://www.abracon.com/Resonators/abm3.pdf, ComponentLink1URL=http://www.abracon.com/Resonators/abm3.pdf, Frequency=12MHz, Height="0.051\" (1.30mm)", Manufacturer Part Number=ABM3-12.000MHZ-B2-T, Mounting Type="Surface Mount", Packaging="Cut Tape (CT)", Pricing 1="1=1.88, 10=1.625, 50=1.425, 100=1.125, 500=0.95 (USD)", RoHS="RoHS Compliant", Size / Dimension="0.197\" L x 0.126\" W (5.00mm x 3.20mm)", Stock 1=22557, Supplier 1=Digi-Key, Type="MHz Crystal"

## Via types
v1: diameter 20, hole 10, Top Layer to Bottom Layer, tented both sides, 320 vias